# Altium PCB Fast_Servo.PCBDOC (part 7 of 11)
Units mm, origin at the board's own origin, x right, y up, seen from the top; angles counter-clockwise.
Board outline 162.48 x 100 mm, 6 copper layers (Top, GP1(GND), L3, L4, P3V3, Bot), stack 1.716 mm thick; 668 components, 491 nets, 2308 pads, 1133 vias.
Unrouted connection lines stored in the file: 2.
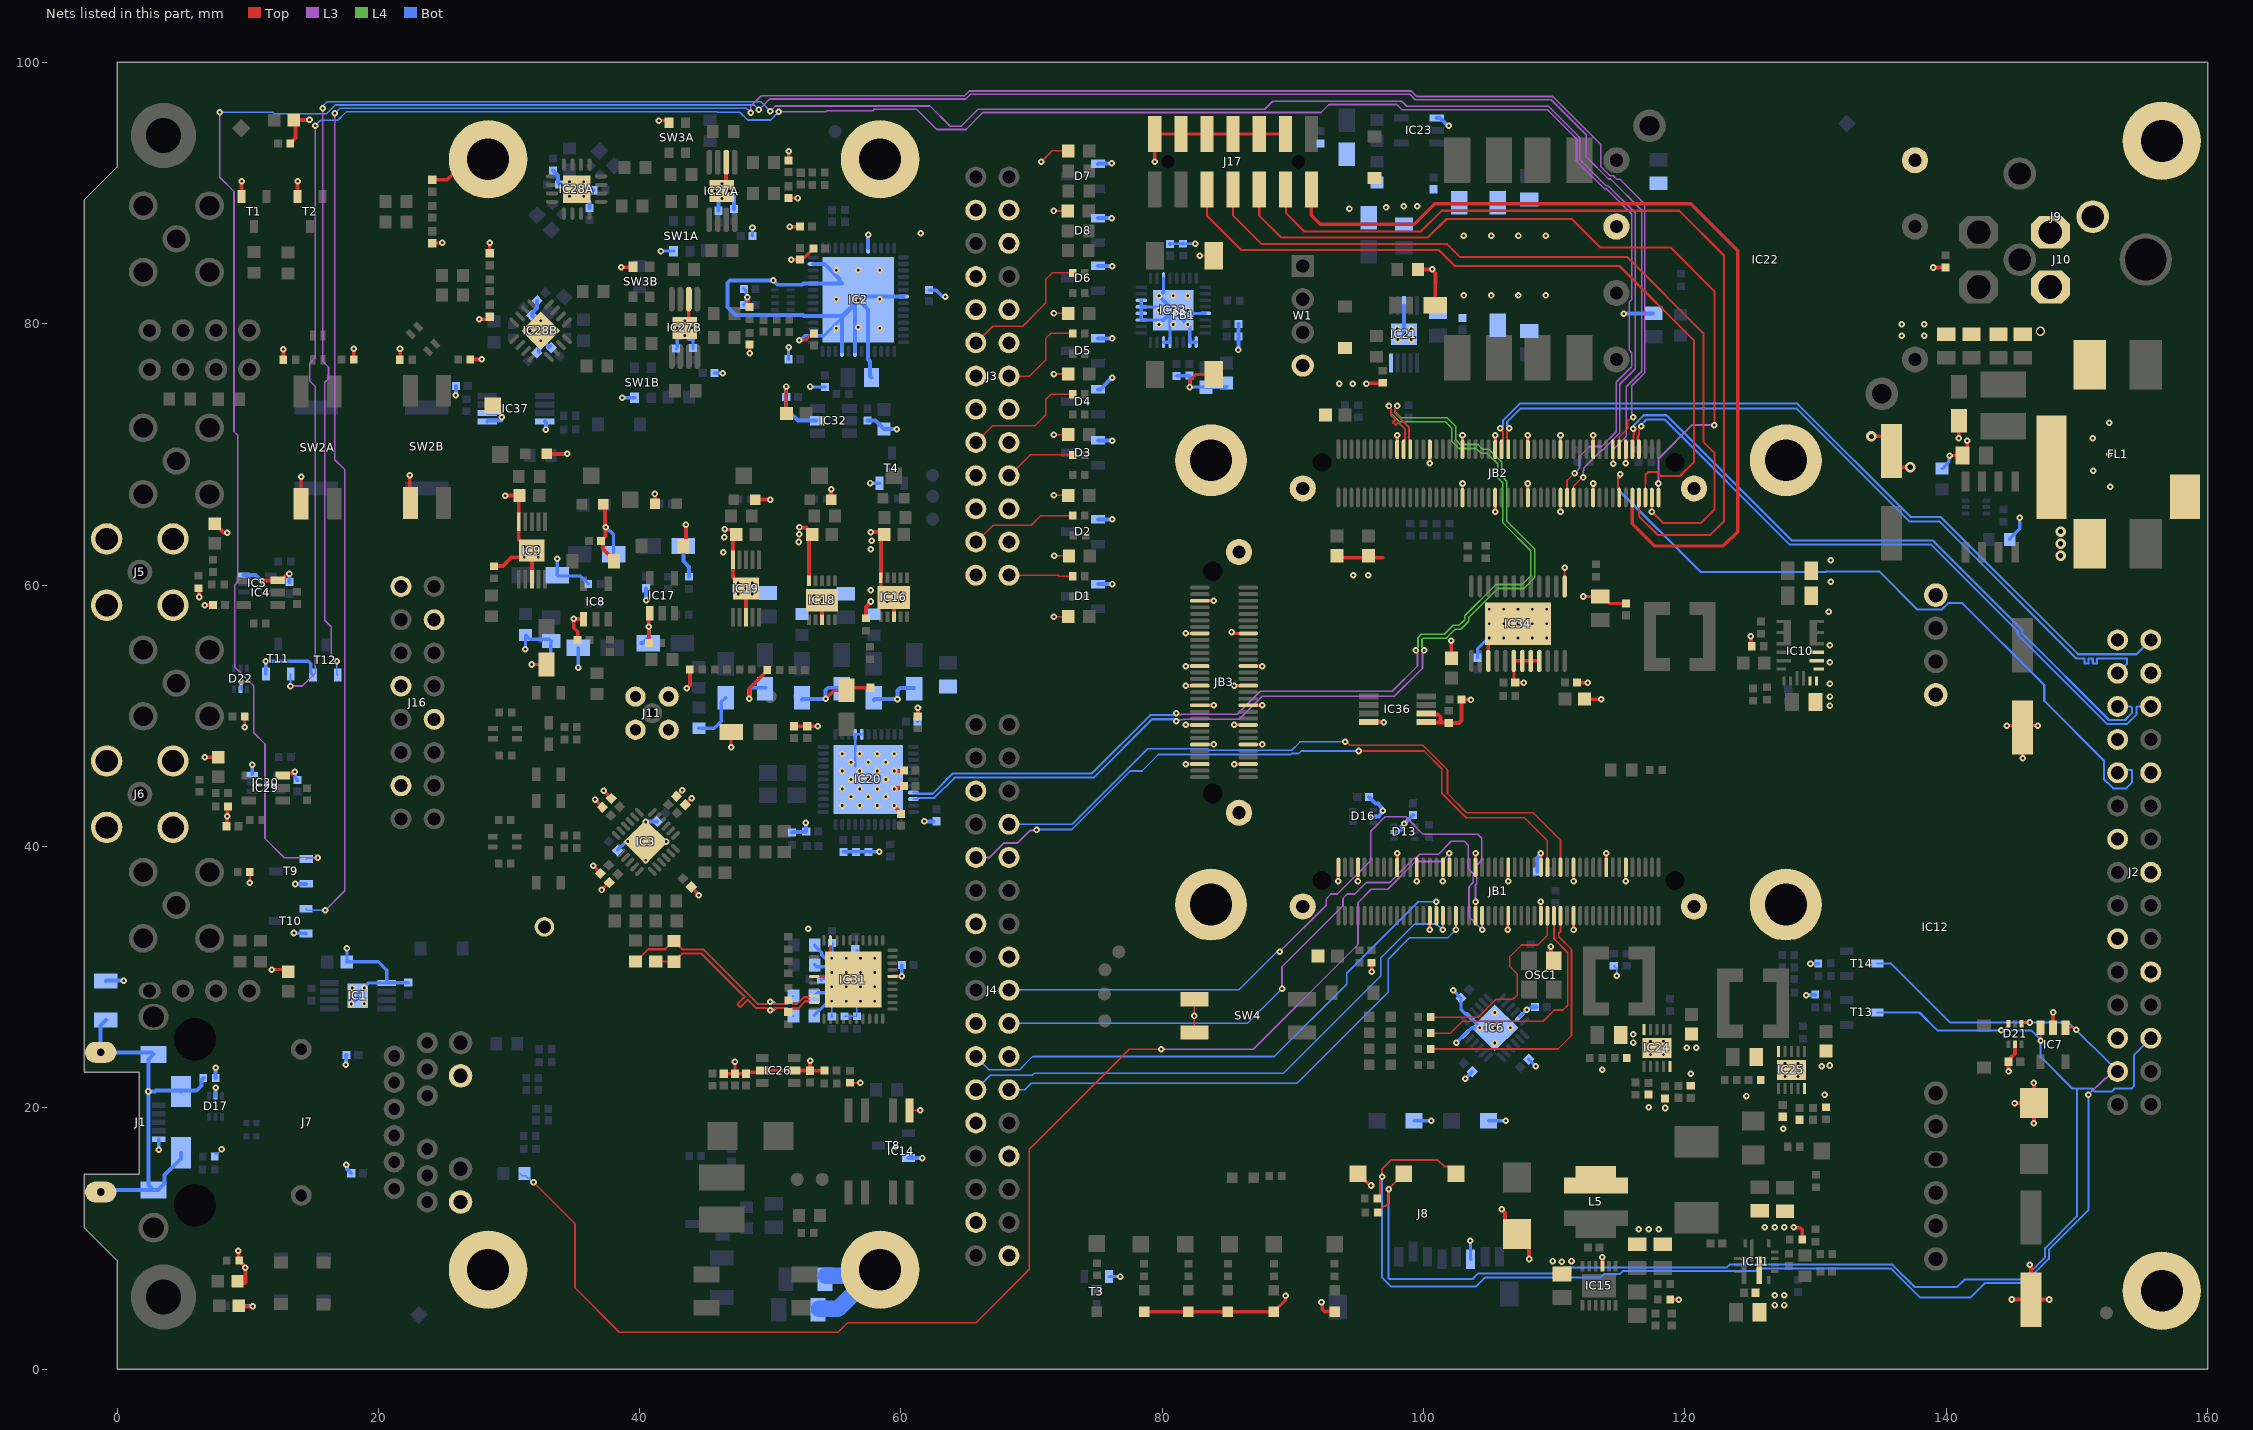
[diagram p9: the nets of this part, all layers, seen from the top]

## Via types
v1: diameter 0.5, hole 0.2, Top to Bot, tented both sides, 1045 vias
v2: diameter 0.8, hole 0.4, Top to Bot, tented both sides, 40 vias
v3: diameter 0.6, hole 0.3, Top to Bot, tented both sides, 27 vias
v4: diameter 1.27, hole 0.711, Top to Bot, tented both sides, 11 vias
v5: diameter 0.7, hole 0.5, Top to Bot, tented both sides, 10 vias

## Nets (pads, with @x,y where several pads share a name; then routed paths per layer and width w, separated by ;. In a path a pad name is that pad's centre, name@x,y a point inside that pad or via, vN(x,y) a via of type N, cw(c..) or ccw(c..) an arc to the next point about the centre after c; other vN are vias at no path point) (continued)
ETH_LED2: JB1.35 R85.1 | length 102.5
  Top w0.125: v1(31.877,14.3) 35.054,11.123 35.054,6.221 38.447,2.828 55.18,2.828 55.905,3.552 65.744,3.552 69.828,7.637 69.828,16.834 77.467,24.473 v1(79.925,24.473) ; JB1.35@101.975,38.404 v1(101.975,39.479)
  L3 w0.125: v1@79.925,24.486 86.958,24.486 94.975,32.503 94.975,35.701 95.999,36.725 97.246,36.725 99.371,38.85 101.346,38.85 v1(101.975,39.479)
  Bot w0.125: R85.1@30.848,14.965 31.012,14.801 31.292,14.801 31.793,14.3 v1(31.877,14.3)
FGND: C3.1 J1.6 J1.7 J1.8 J1.9 J1.10 J1.11 R6.1 | length 30.5
  Bot w0.3: J1.6@-1.25,13.545 -1.1,13.695 J1.9@2.8,13.695 ; C3.1@-0.85,26.711 -1.25,26.311 J1.7@-1.25,24.245 2.65,24.245 J1.8@2.8,24.095 2.398,23.693 v1(2.398,21.245) ; J1.11@4.9,16.545 4.9,16.095 3.65,14.845 3.65,14.196 3.15,13.695 J1.9@2.8,13.695 ; R6.1@6.605,22.275 6.465,22.135 6.465,21.682 6.1,21.317 4.972,21.317 J1.10@4.9,21.245 4.82,21.325 2.983,21.325 2.903,21.245 v1(2.398,21.245) ; v1(2.398,21.245) 2.398,17.177 2.4,17.175 2.4,14.095 J1.9@2.8,13.695
FP_LED_0: JB2.72 T11.1 | length 177.7
  Top w0.125: JB2.72@110.975,66.704 110.975,68.01 111.515,68.55 v1(111.55,68.55)
  L3 w0.125: v1(13.275,52.275) 14.177,52.275 15.175,53.273 15.175,75.2 14.75,75.625 14.75,76.975 15.159,77.384 v1(15.159,95.15) ; v1(50.65,96.225) 54.26,96.225 54.349,96.315 57.857,96.315 57.962,96.419 61.191,96.419 62.735,94.875 64.975,94.875 66.269,96.169 92.148,96.169 92.758,96.78 97.944,96.78 98.328,96.396 109.458,96.396 111.699,94.155 111.699,92.474 113.844,90.328 113.994,90.328 115.938,88.385 115.938,81.864 115.75,81.677 115.75,77.981 115.938,77.793 115.938,76.722 114.75,75.535 114.75,75.483 114.75,71.746 113.614,70.61 112.693,70.61 111.935,69.851 111.935,68.935 v1(111.55,68.55)
  Bot w0.125: v1(13.275,52.275) 13.275,53.182 T11.1@13.296,53.203 ; v1(15.159,95.15) 15.584,95.575 16.895,95.575 17.563,96.243 45.921,96.243 45.964,96.2 47.665,96.2 48.265,95.6 50.025,95.6 v1(50.65,96.225)
FP_LED_1: JB2.74 T12.1 | length 175.1
  Top w0.125: JB2.74@111.475,66.704 111.475,67.568 112.147,68.24 v1(112.225,68.24)
  L3 w0.125: v1(15.75,96.5) 15.75,77.125 16.188,76.687 16.188,75.813 15.9,75.525 15.9,57.31 16.4,56.81 16.4,54.6 v1(16.825,54.175) ; v1(50,96.275) 50.394,96.669 62.216,96.669 63.76,95.125 64.597,95.125 65.891,96.419 87.838,96.419 88.448,97.03 98.327,97.03 98.711,96.646 109.561,96.646 111.949,94.258 111.949,92.577 113.947,90.578 114.098,90.578 116.188,88.489 116.188,76.567 115,75.379 115,71.642 113.663,70.306 113.593,70.306 112.256,68.969 112.256,68.797 112.225,68.766 v1(112.225,68.24)
  Bot w0.125: v1(15.75,96.5) 15.8,96.55 15.8,96.725 16.068,96.993 49.282,96.993 v1(50,96.275) ; v1(16.825,54.175) 16.825,53.187 T12.1@16.9,53.112
FP_LED_2: JB2.85 T9.1 | length 199
  Top w0.125: JB2.85@114.475,70.404 114.475,69.329 114.525,69.279 v1(114.525,69.275)
  L3 w0.125: v1(7.858,96.18) 7.858,91.217 8.95,90.125 8.95,71.758 9.247,71.46 9.247,60.25 9.012,60.015 9.012,53.737 10.475,52.275 10.475,48.7 11.328,47.847 11.328,40.615 12.798,39.145 v1(15.376,39.145) 15.175,39.346 ; v1(49.125,96.4) 49.15,96.4 49.95,97.2 64.959,97.2 65.323,97.564 98.953,97.564 99.37,97.146 109.768,97.146 112.449,94.466 112.449,92.784 114.155,91.078 114.305,91.078 116.688,88.696 116.688,76.36 115.5,75.172 115.5,71.376 114.525,70.401 v1(114.525,69.275)
  Bot w0.125: v1(7.858,96.18) 11.931,96.18 12.048,96.062 16.019,96.062 16.699,96.743 48.782,96.743 v1(49.125,96.4) ; T9.1@14.485,39.042 14.589,39.145 v1(15.376,39.145)
FP_LED_3: JB2.87 T10.1 | length 189.3
  Top w0.125: JB2.87@114.975,70.404 114.977,70.406 114.977,71.341 115.602,71.967 115.602,72.569 115.691,72.657 115.757,72.657 115.939,72.838 v1(116.04,72.838)
  L3 w0.125: v1(15.95,35.125) 17.425,36.6 17.425,68.85 16.675,69.6 v1(16.675,96.1) ; v1(48.514,96.15) 48.514,96.664 49.3,97.45 64.856,97.45 65.22,97.814 99.056,97.814 99.474,97.396 109.872,97.396 113.549,93.719 113.549,92.038 114.258,91.328 114.522,91.328 114.8,91.05 115.039,91.05 116.938,89.151 116.938,76.256 115.938,75.256 115.938,73.099 115.968,73.068 115.968,72.91 v1(116.04,72.838)
  Bot w0.125: T10.1@14.45,35.234 14.559,35.125 v1(15.95,35.125) ; v1(16.675,96.1) 17.068,96.493 48.171,96.493 v1(48.514,96.15)
FPGA_CLK1.CLK_N: IC20.30 JB2.21 | length 80.2
  Top w0.16: 97.501,73.466 97.501,73.028 97.614,72.915 97.807,72.722 cw(c97.773,72.689) 97.807,72.655 97.663,72.51 ccw(c97.697,72.476) 97.663,72.442 97.821,72.284 ccw(c97.855,72.318) 97.889,72.284 98.033,72.428 cw(c98.067,72.394) 98.101,72.428 98.215,72.315 98.565,71.964 98.565,71.132 98.475,71.042 JB2.21@98.475,70.404
  L3 w0.125: v1(81.059,50.208) 81.16,50.208 81.286,50.082 81.425,50.082 81.462,50.119 85.743,50.119 87.499,51.875 97.606,51.875 99.535,53.805 v1@99.535,54.939
  L4 w0.125: v1(97.348,73.711) 97.348,73.611 97.509,73.45 97.509,73.147 98.139,72.517 101.651,72.517 102.019,72.149 102.147,72.021 102.147,70.995 102.683,70.46 104.038,70.46 104.267,70.231 104.394,70.104 104.851,70.104 105.664,69.291 105.664,68.225 105.842,68.047 106.055,67.834 106.055,64.786 106.197,64.643 108.204,62.636 108.204,60.706 107.544,60.045 105.537,60.045 103.142,57.651 103.142,57.361 102.71,56.929 102.272,56.929 101.579,56.236 99.822,56.236 99.57,55.984 99.57,55.438 99.57,55.261 99.409,55.1 v1(99.409,55)
  Bot w0.16: IC20.30@60.95,44.125 61.263,44.125 61.353,44.035 62.418,44.035 63.971,45.587 74.607,45.587 79.075,50.055 v1@80.975,50.055
FPGA_CLK1.CLK_P: IC20.31 JB2.23 | length 80.4
  Top w0.16: 97.821,73.466 97.821,73.16 98.885,72.097 98.885,71.132 98.975,71.042 JB2.23@98.975,70.404
  L3 w0.125: v1(81.059,49.581) 81.16,49.581 81.286,49.707 81.581,49.707 81.618,49.744 85.899,49.744 87.654,51.5 97.761,51.5 99.91,53.649 v1@99.91,54.939
  L4 w0.125: v1(97.975,73.711) 97.975,73.611 97.814,73.45 97.814,73.274 98.265,72.822 101.778,72.822 102.019,72.58 102.452,72.147 102.452,71.121 102.809,70.765 104.165,70.765 104.52,70.409 104.978,70.409 105.969,69.418 105.969,68.351 106.36,67.96 106.36,64.912 108.509,62.763 108.509,60.579 107.67,59.74 105.663,59.74 103.447,57.524 103.447,57.234 102.837,56.624 102.398,56.624 101.705,55.931 99.949,55.931 99.875,55.858 99.875,55.564 99.876,55.261 100.036,55.1 v1(100.036,55)
  Bot w0.16: IC20.31@60.95,43.625 61.263,43.625 61.353,43.715 62.551,43.715 64.103,45.267 74.74,45.267 79.207,49.735 v1@80.975,49.735
GND: B3.1 B4.1 B5.1 B6.1 C1.1 C2.1 C3.2 C4.1 C5.1 C6.1 C7.1 C8.1 C9.1 C10.1 C11.1 C12.1 C13.1 C14.1 C15.1 C16.1 C17.1 C18.1 C19.1 C23.2 C24.2 C25.1 C26.1 C27.1 C28.2 C29.2 C30.2 C31.2 C32.1 C33.1 C34.1 C35.1 C36.1 C37A.1 C37B.1 C38A.1 C38B.1 C39A.1 C39B.1 C41A.2 C41B.2 C45A.1 C45B.1 C46A.1 C46B.1 C47A.1 C47B.1 C48A.1 C48B.1 C49A.1 C49B.1 C51A.1 C51B.1 C52A.1 C52B.1 C57.1 C58.1 C59.1 C60.1 C65.1 C66.1 C67.1 C68.1 C69.1 C70.1 C71.1 C72.1 C73.2 C74.2 C75.1 C76.2 C77.2 C78.1 C79.1 C80.1 C81.2 C82.2 C83.2 C84.1 C85.1 C86.1 C87.1 C88.1 C89.1 C90.1 C91.1 C92.1 C93.1 C94.1 C97.1 C98.1 C99.1 C100.1 C101.1 C102.1 C104.1 C105.1 C106.1 C107.1 C108.1 C109.2 C110.2 C111.1 C112.1 C116.1 C117.1 C118.1 C119.1 C120.1 C121.1 C122.1 C124.2 C125.2 C127.1 C128.2 C129.1 C130.2 C131.2 C132.2 C133.1 C134.1 C135.2 C136.2 C137.1 C138.1 C139.1 C140.1 C141.1 C142.1 C143.2 C144.2 C145.1 C146.1 C147.2 C148.2 C149.1 C150.1 C151.1 C152.1 C153.1 C154.1 C155.2 C156.1 C157.1 C158.1 C159.1 C160.1 C161.1 C162.2 C163.1 C164.1 C165.2 C166.2 C167.1 C168.1 C169.2 C170.1 C171.2 C172.1 C173.1 C174.1 C175.1 C176.1 C177.1 C178.1 C179.1 C180.1 C181.1 C182.1 C183.1 C184.1 C186.1 C187.1 C188.2 C189.2 C190.1 C191.1 C192.1 C193.1 C194.1 C196.1 C197.1 C199.1 C203.1 C204.1 C205.1 D1.1 D2.1 D3.1 D4.1 D5.1 D6.1 D7.1 D8.1 D13.2 D16.2 D17.2 D21.2 D22.2 D23.2 D24.1 D25.1 D27.1 D28.2 D29.1 FL1.4 IC1.1 IC1.9 IC2.2 IC2.5 IC2.10 IC2.13 IC2.22 IC2.33 IC2.45 IC2.47 IC2.49 IC2.53 IC3.25 IC4.3 IC5.3 IC6.2 IC6.11 IC6.24 IC6.25 IC7.2 IC8.1 IC9.5 IC9.8 IC9.11 IC10.1 IC10.2 IC10.3 IC10.17 IC10.18 IC11.9 IC12.7 IC12.10 IC14.3 IC15.9 IC16.5 IC16.8 IC16.11 IC17.1 IC18.5 IC18.8 IC18.11 IC19.5 IC19.8 IC19.11 IC20.15 IC20.16 IC20.45 IC21.5 IC21.8 IC21.11 IC22.3 IC22.5 IC23.1 IC24.5 IC24.10 IC24.11 IC25.5 IC25.10 IC25.11 IC26.2 IC26.5 IC27A.6 IC27A.9 IC27B.6 IC27B.9 IC28A.17 IC28B.17 IC29.3 IC30.3 IC31.6 IC31.19 IC31.25 IC31.41 IC32.2 IC33.1 IC33.2 IC33.5 IC33.6 IC33.11 IC33.12 IC33.13 IC33.14 IC33.19 IC33.29 IC33.33 IC34.1 IC34.15 IC34.18 IC34.19 IC34.20 IC34.21 IC34.25 IC36.4 IC36.5 IC36.6 IC37.4 IC37.5 IC37.6 J1.5 J2.1 J2.4 J2.7 J2.10 J2.13 J2.16 J2.19 J2.22 J2.25 J3.2 J3.3 J3.5 J3.6 J3.8 J3.9 J3.11 J3.12 J3.14 J3.15 J3.17 J3.18 J3.20 J3.21 J3.23 J3.24 J4.1 J4.4 J4.7 J4.10 J4.13 J4.16 J4.19 J4.22 J4.25 J4.30 J5.2 J6.2 J7.15 J7.17 J8.6 J8.10 J11.2 J16.1 J16.4 J16.7 J16.10 J16.13 J17.3 J17.5 J17.7 J17.9 J17.11 J17.13 JB1.1 JB1.7 JB1.19 JB1.25 JB1.30 JB1.33 JB1.43 JB1.53 JB1.54 JB1.63 JB1.64 JB1.73 JB1.74 JB1.83 JB1.89 JB1.F1 JB1.F2 JB2.19 JB2.29 JB2.39 JB2.40 JB2.49 JB2.50 JB2.59 JB2.60 JB2.69 JB2.70 JB2.79 JB2.80 JB2.89 JB2.F1 JB2.F2 JB3.5 JB3.6 JB3.11 JB3.12 JB3.17 JB3.18 JB3.23 JB3.24 JB3.29 JB3.30 JB3.35 JB3.36 JB3.45 JB3.46 JB3.55 JB3.F1 JB3.F2 L5.2 LD6.1 LD7.1 LD8.1 LD9.2 LD10.1 LD11.2 LD12.1 LD13.2 LD14.1 LD15.1 OSC1.2 pad.0 pad.1 pad.3 PB1.3 PB1.4 R5.1 R6.2 R8.1 R9.1 R13.1 R14.1 R15.1 R16.1 R17.2 R18.2 R20.1 R49A.1 R49B.1 R57A.1 R57B.1 R63.1 R73.1 R83.2 R86.1 R92.2 R116.1 R117.1 R119.1 R127.1 R131.1 R134.1 R143.1 R153.1 R154.1 R156.1 R164.1 R167.1 R169.1 R175.1 R178.1 R181.1 R182.1 R183.2 R186.1 R187.1 R189.1 R190.1 R191.2 R192.1 R204.1 R206.1 R211.1 R212.1 R215.1 R217.1 R219.1 R223.1 R225.1 R230.1 SW1A.2 SW1B.2 SW2A.3 SW2B.3 SW3A.2 SW3B.2 SW4.1 SW4.2 T1.2 T2.2 T3.2 T4.2 T8.2 T9.2 T10.2 T11.2 T12.2 TP12.1 TP13.1 TP14.1 W1.4 | length 551.5
  Top w0.125: R20.1@56.1,21.905 56.116,21.921 v1(56.9,21.921) ; IC14.3@60.651,19.803 v1(61.477,19.803) ; v1(70.743,92.405) 71.576,93.238 C18.1@72.809,93.238 ; v1(71.684,88.635) C19.1@72.777,88.635 ; v1(71.709,57.584) C12.1@72.802,57.584 ; v1(71.709,66.871) C14.1@72.802,66.871 ; v1(71.709,71.514) C15.1@72.802,71.514 ; v1(71.709,76.157) C16.1@72.802,76.157 ; v1(71.709,80.8) C17.1@72.802,80.8 ; v1(71.742,62.259) C13.1@72.834,62.259 ; SW4.2@82.457,25.757 v1@82.457,26.935 ; v1(82.457,27.026) SW4.1@82.457,28.297 ; v1(82.875,85.218) PB1.3@83.935,85.218 ; v1(85.3,56.411) v1@85.406,56.305 ; v1(110.795,61.326) 110.798,61.324 110.798,59.907 IC34.1@110.8,59.905
  Top w0.16: v1(9.78,49.129) R189.1@9.78,49.96 ; v1(10.168,37.225) R190.1@10.168,38.056
  Top w0.25: v1(11.851,30.576) 13.098,30.576 C74.2@13.1,30.575 ; SW2A.3@14.086,66.231 v1(14.086,68.3) ; SW2B.3@22.411,66.34 v1(22.411,68.409) ; TP12.1@28.752,73.727 29.407,73.071 29.407,72.899 v1(29.455,72.851) ; v1(31.748,53.925) C109.2@32.875,53.925 ; v1(34.947,57.416) 34.947,56.745 35.253,56.439 C99.1@35.253,55.796 ; C68.1@43.945,36.918 43.945,36.865 v1(44.532,36.277) ; C6.1@46.437,22.605 C9.1@47.176,22.605 ; v1(47,47.6) 47,48.743 C162.2@47.011,48.754 ; v1(47.294,23.51) 47.294,22.723 C9.1@47.176,22.605 ; v1@51.497,87.435 C29.2@52.282,87.435 ; v1(51.59,84.91) 52.226,84.91 52.41,85.094 52.644,85.094 C31.2@53.3,85.75 ; C156.1@51.8,49.2 C157.1@52.825,49.2 v1(53.627,49.2) ; IC26.5@51.843,22.84 IC26.5@51.832,22.851 IC26.2@49.382,22.851 49.26,22.728 48.274,22.728 C10.1@48.151,22.605 C9.1@47.294,22.605 C9.1@47.176,22.605 ; v1(52.224,78.752) 52.685,78.752 53.183,79.25 C26.1@53.334,79.25 ; C11.1@52.964,22.797 52.979,22.782 C11.1@53.017,22.743 ; C11.1@53.016,22.84 C11.1@53.026,22.83 53.034,22.837 54.205,22.837 54.208,22.84 54.204,22.845 C4.1@54.151,22.845 ; IC31.25@53.351,30.055 IC31.41@55.801,30.055 ; v1(54.232,51.292) 54.88,51.94 C155.2@56.244,51.94 ; IC31.19@54.601,32.805 54.601,31.555 v1(54.701,31.455) v1(55.801,30.355) IC31.41@56.351,29.805 ; C155.2@55.825,51.95 56.024,52.149 C158.1@57.659,52.149 ; v1@59.579,42.962 59.588,42.962 C154.1@60,42.55 ; v1@61.225,50.575 v1(61.273,50.623) 61.279,50.617 61.279,49.966 C161.1@61.285,49.96 ; LD9.2@78.614,4.396 88.529,4.396 LD8.1@88.545,4.38 89.431,5.266 v1(89.431,5.624) ; v1(79.422,92.405) J17.13@79.422,94.53 J17.11@81.422,94.53 J17.3@89.422,94.53 ; v1(81.8,46.305) JB3.5@82.875,46.305 ; v1(81.8,49.305) JB3.17@82.875,49.305 ; v1(81.8,52.305) JB3.29@82.875,52.305 ; v1(81.8,53.805) JB3.35@82.875,53.805 ; v1(81.8,56.305) JB3.45@82.875,56.305 ; v1(82.096,75.159) 82.096,75.663 82.552,76.118 PB1.4@83.935,76.118 ; v1@82.457,26.935 v1(82.457,27.026) ; JB3.11@82.875,47.805 v1(83.95,47.805) ; JB3.23@82.875,50.805 v1(83.95,50.805) ; JB3.55@82.875,58.805 v1(83.95,58.805) ; v1@85.406,56.305 JB3.46@86.575,56.305 ; v1(85.5,46.305) JB3.6@86.575,46.305 ; v1(85.5,49.305) JB3.18@86.575,49.305 ; v1(85.5,52.305) JB3.30@86.575,52.305 ; JB3.12@86.575,47.805 v1(87.65,47.805) ; JB3.24@86.575,50.805 v1(87.65,50.805) ; JB3.36@86.575,53.805 v1(87.65,53.805) ; v1(92.184,5.102) 92.232,5.054 92.232,4.564 92.416,4.38 LD10.1@93.191,4.38 ; v1(93.475,37.329) JB1.1@93.475,38.404 ; C131.2@93.536,62.099 95.649,62.099 95.65,62.1 96.868,62.1 ; v1(94.975,37.329) JB1.7@94.975,38.404 ; JB1.19@97.975,38.404 v1(97.975,39.479) ; JB2.19@97.975,70.404 v1(97.975,71.479) ; v1(99.475,37.329) JB1.25@99.475,38.404 ; v1(100.475,33.629) JB1.30@100.475,34.704 ; v1(100.475,69.329) JB2.29@100.475,70.404 ; v1(101.475,37.329) JB1.33@101.475,38.404 ; JB2.40@102.975,66.704 v1(102.975,67.779) ; JB2.39@102.975,70.404 v1(102.975,71.479) ; JB1.43@103.975,38.404 v1(103.975,39.479) ; v1(105.475,65.629) JB2.50@105.475,66.704 ; JB2.49@105.475,70.404 v1(105.475,71.479) ; v1(106.437,33.629) 106.465,33.657 106.465,34.694 JB1.54@106.475,34.704 ; v1(106.475,37.329) JB1.53@106.475,38.404 ; JB2.60@107.975,66.704 v1(107.975,67.779) ; JB2.59@107.975,70.404 v1(107.975,71.479) ; JB1.64@108.975,34.704 v1(108.975,35.779) ; JB1.63@108.975,38.404 v1(108.975,39.479) ; v1(110.475,65.629) JB2.70@110.475,66.704 ; JB2.69@110.475,70.404 v1(110.475,71.479) ; v1(111.475,33.629) JB1.74@111.475,34.704 ; v1(111.475,37.329) JB1.73@111.475,38.404 ; JB2.80@112.975,66.704 v1(112.975,67.779) ; JB2.79@112.975,70.404 v1(112.975,71.479) ; JB1.83@113.975,38.404 v1(113.975,39.479) ; v1(115.475,37.329) JB1.89@115.475,38.404 ; v1(115.475,69.329) JB2.89@115.475,70.404 ; v1(140.25,69.916) C176.1@141.235,69.916 141.596,70.277 v1(141.596,71.042) ; v1(140.947,71.249) 140.947,72.569 C171.2@140.971,72.592 ; v1(144.615,49.25) v1(147,49.25) ; v1(145.85,46.75) C124.2@145.85,49.104
  Top w0.254: C47A.1@24.14,86.165 24.157,86.182 24.882,86.182 v1(24.9,86.2) ; C39A.1@24.14,91.035 25.28,91.035 26.845,92.6 pad.3@28.4,92.6 pad.3@28.992,92.008 ; v1(27.722,80.35) 28.35,80.35 C47B.1@28.54,80.54 ; v1(28.525,86.2) 28.532,86.193 28.532,85.417 C39B.1@28.54,85.41 ; v1@36.434,38.514 C59.1@37,37.948 ; v1@36.585,43.574 C57.1@37.15,43.008 ; v1@37.106,36.671 C65.1@37.672,37.236 ; v1@37.256,44.245 C67.1@37.822,43.68 ; v1(38.589,84.327) 39.466,84.327 SW3B.2@39.504,84.364 ; v1(41.477,95.555) 42.059,95.555 SW3A.2@42.239,95.375 ; C60.1@42.754,43.795 C60.1@42.762,43.787 ; C60.1@42.893,43.843 C60.1@42.818,43.843 43.274,44.299 v1(43.274,44.315) ; C58.1@43.424,43.124 C58.1@43.426,43.123 ; IC27B.9@43.438,79.687 43.763,80.012 IC27B.6@43.763,81.887 ; C58.1@43.481,43.193 C58.1@43.493,43.193 v1(44,43.7) ; v1(48.253,82.043) 48.3,81.995 48.3,81.405 C45B.1@48.422,81.283 ; C41B.2@48.422,78.405 48.424,78.403 48.424,77.757 v1(48.426,77.755) ; C32.1@51.081,73.146 51.226,73.29 v1(51.226,75.2) ; C41A.2@51.4,89.625 v1(52.088,89.625) ; C45A.1@51.4,92.503 v1(51.4,93.206) ; IC31.6@59.351,30.055 v1(60.051,30.055) ; TP13.1@94.975,14.956 95.834,14.097 95.928,14.097 v1(95.975,14.05) ; v1(96.02,30.416) R156.1@96.02,31.109 ; C93.1@102.125,54.405 v1(102.125,55.729) ; IC34.15@104.95,54.205 IC34.25@104.95,55.955 ; v1(107.674,52.539) C97.1@107.013,52.539 106.918,52.634 106.918,54.186 IC34.18@106.9,54.205 IC34.19@107.55,54.205 IC34.20@108.2,54.205 IC34.21@108.85,54.205 ; C92.1@111.725,52.539 v1(112.571,52.539) ; v1(112.225,59.129) C120.1@113.525,59.129 113.836,58.818 113.975,58.818 114.195,58.598 C121.1@115.475,58.598 ; C91.1@112.313,51.275 v1(113.581,51.275) ; v1(128.327,10.87) 128.374,10.823 128.834,10.823 128.977,10.68 R143.1@128.977,9.92 ; v2(134.275,71.383) 135.127,71.383 135.8,70.71 C125.2@135.8,70.275 135.8,69.698 136.473,69.025 v2(137.25,69.025)
  Top w0.3: R83.2@6.24,59.774 6.271,59.743 6.271,59.121 v1(6.302,59.09) ; v1(6.73,46.825) 7.721,46.825 C72.1@7.736,46.84 ; v1(6.73,58.46) 6.738,58.467 7.342,58.467 C70.1@7.35,58.475 ; C69.1@7.475,64.71 8.147,64.038 8.392,64.038 v1(8.43,64) ; C71.1@8.39,41.544 8.41,41.564 8.41,42.288 v1(8.43,42.309) 8.463,42.342 8.463,43.017 R92.2@8.496,43.05 ; v1(9.275,9.05) 9.31,9.015 9.31,8.335 R86.1@9.345,8.3 9.345,8.28 9.825,7.8 v1(9.825,7.75) 9.825,6.625 9.775,6.575 9.525,6.575 C76.2@9.375,6.725 ; C83.2@9.475,4.85 9.525,4.8 v1(10.4,4.8) ; T1.2@9.538,89.731 v1(9.539,90.902) ; v1(11.084,60.314) 11.114,60.345 12.268,60.345 IC4.3@12.298,60.375 12.548,60.375 12.991,60.818 13.162,60.818 v1(13.2,60.856) ; IC29.3@12.695,45.42 12.845,45.57 13.397,45.57 13.542,45.715 v1(13.596,45.715) ; v1(12.715,78.067) 12.73,78.052 R49A.1@12.73,77.245 ; R116.1@13.26,93.8 13.26,93.82 13.67,94.23 13.67,95.555 13.721,95.606 v1(14.732,95.606) ; T2.2@13.825,89.731 v1(13.826,90.903) ; R57A.1@18.12,77.275 v1@18.12,78.081 ; R49B.1@21.675,77.28 v1@21.675,78.086 ; R57B.1@27.084,77.28 v1@27.891,77.28 ; R219.1@28.85,61.459 29.531,61.459 30.204,62.131 v1(31.17,62.131) ; v1(29.728,66.849) C197.1@30.803,66.849 ; C197.1@30.745,66.791 IC9.5@30.745,64.849 30.745,63.499 31.595,62.649 IC9.11@31.745,62.649 IC9.8@31.745,60.449 ; LD6.1@32.902,70.045 v1(34.455,70.045) ; v1(34.947,57.416) 35.682,57.416 IC8.1@35.703,57.395 ; LD11.2@37.203,66.201 37.363,66.041 37.363,64.48 v1(37.401,64.442) 37.401,63.745 37.195,63.538 37.195,63.529 37.039,63.374 37.03,63.374 37.195,63.209 37.195,62.764 38.053,61.905 D24.1@38.053,61.825 ; C137.1@40.724,55.561 40.724,55.911 40.699,55.886 v1(40.699,56.823) 40.699,57.76 IC17.1@40.774,57.835 ; v1(41.163,66.978) 41.168,66.972 41.168,66.236 LD13.2@41.174,66.231 ; D27.1@43.5,63.473 43.543,63.516 v1(43.543,64.63) ; v1(43.604,52.105) 43.85,52.351 R212.1@43.85,53.553 ; IC27A.9@46.299,90.162 46.624,90.487 IC27A.6@46.624,92.362 ; v1(46.512,64.262) 46.536,64.238 47.057,64.238 47.382,63.913 C145.1@47.382,63.888 47.131,63.638 IC19.5@47.131,61.942 47.131,60.591 v1(47.557,60.167) 47.982,59.742 IC19.11@48.132,59.742 ; IC19.8@48.132,57.542 IC19.11@48.132,59.742 ; IC19.11@48.182,59.792 IC19.11@48.132,59.742 ; v1(48.394,51.292) 48.394,52.105 49.766,53.477 R215.1@49.766,53.497 ; LD7.1@48.863,66.539 49.988,66.539 v1(49.99,66.541) ; IC26.5@51.843,22.84 C11.1@53.016,22.84 ; v1(52.231,64.442) 52.27,64.404 52.717,64.404 53.207,63.913 C141.1@53.207,63.888 52.957,63.638 IC18.5@52.957,60.591 ; C11.1@53.026,22.83 53.026,23.579 v1(53.05,23.602) ; IC18.8@53.957,57.542 IC18.11@53.957,58.843 ; LD12.1@54.659,66.539 v1@54.659,67.325 ; R217.1@57.324,57.452 57.324,58.324 57.693,58.693 v1(57.693,58.747) ; v1(57.693,64.06) 58.517,64.06 C133.1@58.708,63.869 58.458,63.619 IC16.5@58.458,60.572 ; IC16.5@58.455,60.567 58.455,59.792 59.18,59.067 IC16.11@59.455,59.067 ; IC16.8@59.458,57.522 IC16.11@59.458,59.067 ; v1(59.485,44.4) 59.539,44.4 59.604,44.465 60.065,44.465 C160.1@60.225,44.625 ; v1(59.485,45.775) 59.497,45.788 60.213,45.788 C152.1@60.225,45.8 ; v1(95.626,75.424) 95.654,75.452 96.84,75.452 R223.1@96.868,75.48 ; IC36.4@95.816,49.515 95.821,49.511 96.954,49.511 v1(96.959,49.506) ; R175.1@99.575,84.15 99.588,84.163 v1(100.662,84.163) 100.662,84.109 100.911,83.86 100.911,83.063 100.892,83.043 C166.2@100.892,81.411 ; IC36.5@100.216,49.515 100.248,49.483 101.28,49.483 ; IC36.6@100.216,50.165 100.291,50.09 101.099,50.09 101.28,49.91 101.28,49.483 ; v1(103.625,51.212) 103.597,51.24 C204.1@102.891,51.24 102.9,51.232 102.9,49.655 102.695,49.45 R230.1@101.923,49.45 101.891,49.483 101.28,49.483 ; v1(105.975,12.237) 106.228,11.983 106.228,11.275 D25.1@107.153,10.35 108.07,9.433 v1(108.07,8.425) ; v1(109.735,32.339) 109.735,31.491 OSC1.2@109.97,31.256 ; IC15.9@113.675,7.87 v1(113.675,8.55) ; R183.2@118.867,5.32 v1(119.539,5.32) ; v1(125.047,56.077) 125.047,55.38 R131.1@125.105,55.322 ; v1(139,84.309) 139.001,84.31 R178.1@139.95,84.31 ; v1(144.765,22.778) C98.1@144.765,23.525 144.925,23.685 144.925,23.794 145.265,24.134 D21.2@145.265,24.861 ; v1(145,5.327) 146.473,5.327 C81.2@146.5,5.3 ; v1(145.225,20.35) 145.322,20.35 145.347,20.375 D23.2@146.7,20.375 ; v1(146.375,8) 146.375,7.946 146.5,7.821 C81.2@146.5,5.3 ; v1(146.7,18.821) D23.2@146.7,20.375 ; v1(146.7,21.898) D23.2@146.7,20.375 ; v1(147.875,5.327) 146.527,5.327 C81.2@146.5,5.3 ; IC7.2@148.175,26.125 v1(148.175,27.293)
  Bot w0.125: R5.1@7.503,16.5 7.7,16.5 8,16.8 v1(8,16.825) ; R18.2@54.701,26.987 v1(54.701,28.155) ; R15.1@55.676,27 R16.1@56.626,27 56.626,27.812 v1@56.901,28.087 ; C80.1@103.715,22.765 C80.1@103.718,22.765 ; R186.1@114.55,30.862 114.553,30.862 114.781,30.634 v1(114.781,30.101)
  Bot w0.16: J16.10@24.27,49.73 J16.10@24.295,49.73
  Bot w0.2: IC20.45@56.5,46.125 IC20.15@56.5,48.475 ; IC20.15@56.5,48.575 IC20.16@57,48.575 ; C84.1@80.612,86.124 R119.1@81.558,86.124 ; R119.1@81.573,86.139 v1(82.508,86.139)
  Bot w0.25: v1(3.2,16.775) J1.5@3.2,17.595 ; v1(17.6,32.2) 17.6,31.178 C2.1@17.593,31.171 20.013,31.171 20.643,30.541 IC1.1@20.643,29.556 ; IC1.9@17.773,28.263 18.037,28 18.443,28.406 IC1.9@18.443,28.581 18.443,28.741 19.258,29.556 IC1.1@20.643,29.556 ; C1.1@22.293,29.581 22.281,29.569 20.656,29.569 IC1.1@20.643,29.556 ; v1(31.258,55.079) R134.1@31.258,56.188 31.583,55.863 33.087,55.863 C108.1@33.231,55.718 33.188,55.675 33.188,54.288 32.825,53.925 v1(31.748,53.925) v1@31.745,53.928 ; C38B.1@31.801,80.584 32.136,80.248 v1(32.419,80.248) ; v1(33.688,62.025) C110.2@33.688,60.762 33.76,60.69 35.464,60.69 35.873,60.28 35.893,60.28 36.058,60.115 R127.1@36.058,60.095 ; C38A.1@33.952,90.662 34.427,90.662 34.579,90.814 v1(34.627,90.862) ; v1@34.947,57.349 v1(34.947,57.416) ; v1(37.401,64.442) 38.005,63.839 C101.1@38.005,62.373 ; R73.1@38.301,39.702 38.974,40.375 v1(39.075,40.375) ; C66.1@43.966,36.868 44.532,36.301 v1(44.532,36.277) ; C48A.1@48.637,86.717 v1(48.637,87.352) ; C30.2@51.384,77.286 51.392,77.294 51.392,78.195 v1(51.4,78.203) ; v1(52.224,78.752) 52.292,78.752 52.628,79.088 IC2.2@53.284,79.088 54.109,79.088 IC2.53@56.484,81.463 ; v1(53.05,75.2) 53.094,75.156 C28.2@54.2,75.156 ; R9.1@53.368,27.067 54.014,27.713 54.456,28.155 v1(54.701,28.155) ; R8.1@53.368,28.553 53.628,28.813 54.26,28.813 v1(54.701,29.255) ; R13.1@53.394,30.94 53.537,30.797 54.26,30.797 v1(54.701,30.355) 54.701,30.055 54.56,29.913 54.009,29.913 C8.1@53.901,29.805 ; R14.1@53.394,32.453 53.394,32.403 53.941,31.856 53.941,31.719 54.205,31.455 v1(54.701,31.455) 54.714,31.467 54.714,32.597 R17.2@54.726,32.61 ; R18.2@54.701,26.987 R18.2@54.705,26.983 ; C159.1@55.59,39.585 C149.1@56.545,39.585 ; C149.1@56.5,39.6 v1(58.35,39.6) ; C7.1@56.63,32.03 56.861,31.799 56.861,31.495 v1(56.901,31.455) ; v1@56.901,28.087 v1(56.901,28.155) ; v1(60.051,30.055) 60.061,30.065 60.061,30.92 C5.1@60.071,30.93 ; C153.1@61.275,49.575 61.275,50.425 v1@61.475,50.625 ; C36.1@62.141,82.593 62.165,82.569 62.7,82.569 63.205,82.064 v1(63.382,82.064) ; T3.2@75.929,7.086 T3.2@75.932,7.083 v1(76.788,7.083) ; IC33.14@78.396,81.793 IC33.13@78.396,81.298 IC33.13@78.396,81.293 ; IC33.33@79.746,81.293 IC33.13@78.396,81.293 ; IC33.6@80.096,78.593 80.596,78.593 IC33.5@80.596,78.598 IC33.33@80.596,80.793 ; IC33.33@80.096,80.293 78.396,80.293 IC33.11@78.396,80.298 IC33.12@78.396,80.798 IC33.13@78.396,81.293 ; IC33.33@80.096,82.443 IC33.19@80.096,83.493 ; IC33.33@81.096,80.793 IC33.29@83.296,80.793 ; C85.1@81.098,76.019 81.106,76.027 82.089,76.027 C87.1@82.096,76.034 v1(82.096,75.159) 83.333,75.159 C86.1@83.348,75.144 84.867,75.144 C89.1@84.923,75.2 ; IC33.33@82.096,79.793 IC33.2@82.096,78.598 82.096,78.593 IC33.1@82.596,78.593 ; J8.10@99.27,19 v1(100.59,19) ; v1(102.255,28.995) 102.255,28.992 102.857,28.39 102.857,27.945 ; v1(102.501,24.976) IC6.24@103.155,25.63 ; 102.856,27.945 102.856,27.53 103.191,27.195 103.319,27.195 IC6.2@103.541,26.974 IC6.25@104.389,26.125 ; v1(103.175,22.225) C80.1@103.715,22.765 ; IC6.24@103.187,25.63 103.201,25.63 103.696,26.125 IC6.25@104.389,26.125 ; v1(103.575,9.825) 103.588,9.812 103.588,8.413 J8.6@103.6,8.4 ; C94.1@104.125,54.438 104.125,55.122 104.957,55.955 v1(105.025,55.955) ; J8.10@104.97,19 v1(106.29,19) ; v1(105.45,26.125) IC6.25@104.389,26.125 ; IC6.11@107.361,26.974 v1(107.9,27.513) 107.968,27.513 108.096,27.641 108.55,27.641 C129.1@108.625,27.716 ; C79.1@108.04,23.719 v1(108.579,23.178) ; R153.1@139.672,68.92 139.722,68.92 140.047,69.245 140.047,69.295 140.202,69.451 140.202,69.869 v1(140.25,69.916) ; R154.1@144.857,63.5 144.857,63.55 145.617,64.31 v1(145.617,65.145)
  Bot w0.254: D22.2@9.46,52.046 9.483,52.069 9.483,52.576 v1(9.519,52.612) ; IC30.3@10.345,45.515 v1(10.345,46.25) ; v1(11.395,54.175) 14.648,54.175 14.83,53.993 14.83,53.282 T12.2@15,53.112 ; T11.2@11.396,53.203 v1(11.395,54.175) ; v1(35.303,53.694) C100.1@35.303,55.206 ; v1(38.654,74.347) SW1B.2@39.627,74.347 ; v1(41.632,85.567) SW1A.2@42.592,85.567 SW1A.2@42.605,85.567 ; C46B.1@42.789,78.101 42.888,78.2 42.888,78.943 v1(42.888,79.687) ; v1(43.988,79.687) 43.988,79.621 44.084,79.525 44.084,78.831 C48B.1@44.084,78.136 ; R191.2@44.532,49.042 45.725,49.042 46.25,49.566 46.25,51.058 C148.2@46.584,51.392 ; C49B.1@45.73,76.247 45.744,76.233 46.346,76.233 v1(46.359,76.22) ; C23.2@47.975,81.438 48.158,81.621 48.158,81.881 48.298,82.022 v1@48.298,82.088 ; C24.2@47.975,82.679 48.142,82.512 48.142,82.28 48.206,82.216 48.206,82.09 v1(48.253,82.043) ; C33.1@51.218,74.402 51.222,74.406 51.222,75.196 v1(51.226,75.2)
  Bot w0.3: C3.2@-0.85,29.711 -0.836,29.725 v1(0.525,29.725) ; v1(7.545,21.541) 7.551,21.535 D17.2@7.551,20.907 ; R6.2@7.545,22.275 7.548,22.278 7.548,23.054 v1(7.551,23.057) ; R117.1@9.294,4.85 9.319,4.825 10.375,4.825 v1(10.4,4.8) ; IC5.3@9.695,60.784 10.595,60.784 11.064,60.314 v1(11.084,60.314) ; C190.1@13.2,60.244 v1(13.2,60.856) ; v1(13.542,33.375) 13.562,33.355 14.43,33.355 T10.2@14.45,33.334 ; v1(13.596,45.715) 13.596,45.661 13.64,45.617 13.64,45.26 C191.1@13.8,45.1 ; v1(13.64,37.125) 13.648,37.133 14.477,37.133 T9.2@14.485,37.142 ; v1(17.5,23.291) 17.53,23.321 17.53,24.006 C77.2@17.559,24.036 ; v1(17.559,15.64) 17.598,15.602 17.598,15.316 C75.1@17.924,14.99 ; v1(25.937,74.524) 25.941,74.527 25.941,75.248 C205.1@25.945,75.252 ; IC37.5@28.335,72.524 28.41,72.599 29.371,72.599 29.417,72.645 29.417,72.813 v1(29.455,72.851) ; IC37.6@28.335,73.174 29.296,73.174 29.465,73.005 29.465,72.944 29.519,72.89 v1@29.548,72.89 ; C38B.1@31.801,80.584 31.801,80.874 32.151,81.225 C51B.1@32.151,81.756 ; C37B.1@32.289,77.89 32.289,78.508 32.419,78.638 v1(32.419,78.692) 32.458,78.654 32.621,78.654 33.066,78.209 C52B.1@33.179,78.322 ; IC37.4@32.735,72.524 32.751,72.524 32.826,72.449 v1(32.826,71.907) ; C51A.1@33.371,91.739 33.746,91.364 33.746,90.868 C38A.1@33.952,90.662 ; v1(35.727,89.762) v1(35.727,89.762) 36.152,89.336 C37A.1@36.152,88.855 ; v1(35.727,90.862) 36.364,90.225 C52A.1@36.471,90.225 ; C138.1@40.149,55.561 40.224,55.561 40.444,55.781 40.699,56.036 v1(40.699,56.823) ; v1(40.475,41.875) 40.529,41.875 40.571,41.917 41.302,41.917 R63.1@41.316,41.903 ; v1(40.499,58.843) C140.1@40.499,59.76 ; 42.888,78.943 43.222,78.943 ; v1(43.438,79.106) 43.492,79.106 43.767,78.831 44.084,78.831 ; v1(43.543,64.63) 43.543,63.213 43.337,63.007 C139.1@43.349,62.995 43.349,61.825 43.774,61.4 R167.1@43.774,60.655 ; v1(45.749,90.162) 45.749,90.108 46.049,89.808 46.049,88.659 C46A.1@46.04,88.65 ; v1(46.849,90.162) 46.849,90.108 47.214,89.743 C49A.1@47.214,88.791 ; v1(48.394,51.292) 48.399,51.297 48.399,51.968 48.575,52.143 C147.2@49.65,52.143 ; v1(50.211,83.317) 46.9,83.317 46.724,83.141 46.724,81.288 47.333,80.679 52.49,80.679 52.581,80.589 IC2.5@53.284,80.589 55.484,80.589 IC2.53@56.734,81.838 ; v1@50.218,83.31 50.537,82.99 52.435,82.99 52.533,83.088 IC2.10@53.284,83.088 55.484,83.088 55.283,83.289 55.283,83.439 54.134,84.589 IC2.13@53.284,84.589 ; C33.1@51.218,74.402 51.218,73.496 52.121,72.593 IC32.2@53.487,72.593 ; R225.1@51.669,41.065 51.703,41.1 52.712,41.1 C203.1@52.747,41.134 52.732,41.15 52.732,41.802 v1(52.716,41.817) ; C144.2@52.422,51.242 52.472,51.292 v1(54.232,51.292) 54.237,51.297 54.237,51.968 54.412,52.143 C143.2@55.487,52.143 ; IC2.49@55.484,77.888 IC2.53@55.484,80.438 ; IC2.47@56.484,77.888 IC2.53@56.484,81.463 ; C35.1@57.425,72.6 58.041,72.6 C34.1@58.698,71.943 v1(59.684,71.943) ; IC2.22@57.484,85.788 57.484,86.79 v1(57.499,86.805) ; v1(57.634,67.814) 57.653,67.796 T4.2@58.355,67.796 ; C25.1@57.734,75.883 57.634,75.983 57.634,77.114 57.484,77.264 IC2.45@57.484,77.888 57.484,81.088 IC2.53@56.734,81.838 ; C136.2@57.923,51.222 57.973,51.273 v1(59.733,51.273) 59.738,51.277 59.738,51.948 59.914,52.124 C135.2@60.989,52.124 ; IC2.33@60.184,82.088 56.984,82.088 IC2.53@56.734,81.838 ; T8.2@60.562,16.154 61.623,16.154 v1(61.625,16.152) ; v1(61.797,41.925) C151.1@62.5,41.925 ; D1.1@75.084,60.084 v1(76.177,60.084) ; D2.1@75.084,65.034 v1(76.177,65.034) ; D3.1@75.084,71.069 76.151,71.069 v1(76.177,71.044) ; D4.1@75.084,74.975 75.089,74.98 75.254,74.98 v1(76.158,75.883) ; D5.1@75.084,78.884 75.088,78.881 76.173,78.881 v1(76.177,78.877) ; D6.1@75.084,84.434 75.106,84.413 76.155,84.413 v1(76.177,84.391) ; D7.1@75.084,92.235 75.109,92.26 76.109,92.26 v1(76.134,92.285) ; D8.1@75.084,88.085 v1(76.134,88.084) ; IC33.33@79.746,82.143 81.096,80.793 81.944,79.946 81.946,79.943 IC33.33@82.096,79.793 ; IC33.33@79.946,82.293 IC33.33@80.096,82.443 ; IC33.33@80.096,80.293 IC33.33@80.596,80.793 ; C84.1@80.596,86.108 C84.1@80.612,86.124 ; R119.1@81.558,86.124 R119.1@81.573,86.139 ; v1@85.828,78 C90.1@85.828,79.043 C88.1@85.828,79.994 ; C189.2@95.82,43.775 96.322,43.273 96.508,43.273 96.831,42.951 96.831,42.78 v1(96.869,42.741) 96.831,42.703 96.831,42.584 96.544,42.297 D16.2@96.16,42.297 ; D13.2@97.742,41.112 98.066,41.112 98.302,41.348 98.302,41.525 v1(98.522,41.745) 98.524,41.745 C73.2@99.187,42.408 ; IC21.11@98.5,79.2 IC21.8@98.5,81.4 ; IC23.1@101,95.744 101.275,95.744 101.867,95.152 v1(101.916,95.152) ; C129.1@108.325,27.766 108.55,27.766 108.6,27.716 C129.1@108.625,27.716 ; C188.2@108.7,38.075 108.7,38.85 108.675,38.875 108.675,39.125 108.95,39.4 v1@108.975,39.4 ; v1(115.313,80.78) 117.555,80.78 C167.1@117.574,80.799 ; v1(129.28,28.621) 129.299,28.64 129.945,28.64 R192.1@129.964,28.658 ; v1(129.61,31.017) 129.617,31.024 130.208,31.024 R211.1@130.215,31.031
  Bot w1.27: C127.1@53.704,4.604 55.175,4.604 pad.0@57.727,7.156 ; C122.1@54.253,7.156 pad.0@57.727,7.156 ; pad.0@58.4,7.6 57.956,7.156 pad.0@57.727,7.156
  other v1: 126.882,4.901 127.603,4.901 126.877,5.645 127.603,5.645 110.57,8.22 109.875,8.27 111.318,8.27 116.475,10.695 117.237,10.695 117.987,10.695 126.122,10.87 126.877,10.87 127.603,10.87 127.53,18.401 118.496,19.983 117.218,20.039 124.71,20.899 130.685,21.003 127.655,22.393 128.655,22.393 120.444,22.59 113.668,22.918 130.475,23.178 131.095,23.234 127.655,23.393 128.655,23.393 117.362,24.078 118.362,24.078 120.134,24.58 120.869,24.58 105.45,24.958 116.055,24.991 117.362,25.078 118.362,25.078 116.055,25.611 104.283,26.125 106.617,26.125 105.45,27.292 17.934,27.943 18.909,27.968 55.801,28.155 58.001,28.155 18.009,29.168 18.909,29.168 55.801,29.255 56.901,29.255 58.001,29.255 56.901,30.355 58.001,30.355 55.801,31.455 58.001,31.455 52.9,33.695 37.088,36.671 36.434,38.531 40.475,38.95 42.025,40.375 55.507,43.132 56.855,43.132 58.198,43.132 59.485,43.132 36.585,43.591 56.175,43.8 57.5,43.8 58.825,43.8 37.256,44.263 55.507,44.4 56.855,44.4 58.198,44.4 56.175,45.125 57.5,45.125 58.825,45.125 55.507,45.775 56.855,45.775 58.198,45.775 56.175,46.45 57.5,46.45 58.825,46.45 55.507,47.1 56.855,47.1 58.198,47.1 59.485,47.1 131.1,50.772 131.1,51.472 131.1,52.462 131.1,54.097 131.1,55.397 106.125,55.955 107.225,55.955 108.325,55.955 109.425,55.955 105.025,57.055 106.125,57.055 107.225,57.055 108.325,57.055 109.425,57.055 131,57.972 105.025,58.155 106.125,58.155 107.225,58.155 108.325,58.155 109.425,58.155 53.323,58.565 54.639,58.565 58.936,58.747 60.001,58.747 53.937,58.843 59.485,59.102 53.323,59.185 54.639,59.185 47.557,59.325 48.622,59.325 58.936,59.428 60.001,59.428 57.693,59.595 48.112,59.75 48.622,60.167 131.15,60.272 94.625,60.759 95.764,60.759 131.15,61.9 32.235,62.131 46.399,62.522 57.693,62.734 31.17,62.973 32.235,62.973 52.166,63.299 57.76,63.398 46.484,63.679 52.226,63.888 54.65,67.325 152.549,67.515 151.25,68.75 152.467,70.005 151.217,71.249 152.467,72.438 93.536,75.424 94.581,75.424 27.906,77.295 85.826,77.997 18.105,78.096 21.66,78.101 98.02,78.793 99.065,78.793 136.587,79.073 138.327,79.073 31.641,79.47 33.197,79.47 97.995,79.625 99.04,79.625 55.035,79.672 58.362,79.672 56.734,79.739 79.746,79.948 80.846,79.948 81.946,79.948 136.587,79.979 138.327,79.979 43.438,80.225 79.746,81.048 80.846,81.048 81.946,81.048 56.734,81.821 55.035,81.887 58.362,81.887 79.746,82.148 80.846,82.148 81.946,82.148 103.08,82.168 105.17,82.168 107.26,82.168 109.35,82.168 55.035,84.103 56.734,84.103 58.362,84.103 103.08,86.729 105.17,86.729 107.26,86.729 109.35,86.729 61.504,86.917 51.492,87.44 94.325,88.8 97.125,88.905 98.475,89.01 99.52,89.01 46.3,89.594 34.627,89.762 46.299,90.71
  other v2: 148.75,62.25 148.75,63.175 148.75,64.099
  other v5: 147.21,79.433
GNDF: FL1.3 J9.1 J10.1 J10.2
HRTIM_CHA1: J4.14 JB1.32 | length 42.6
  Top w0.125: JB1.32@100.975,34.704 v1(100.975,35.779)
  Bot w0.125: J4.14@65.73,23.92 66.733,22.917 69.069,22.917 70.072,23.92 88.578,23.92 94.12,29.463 94.12,30.303 99.596,35.779 v1(100.975,35.779)
HRTIM_CHA2: J4.15 JB1.46 | length 50.6
  Top w0.16: v1(104.475,33.629) JB1.46@104.475,34.704
  L3 w0.125: v1(89.164,29.102) 89.164,30.797 93.83,35.462 93.83,36.022 94.165,36.357 94.724,36.357 95.611,37.244 97.412,37.244 99.268,39.1 99.393,39.1 99.704,39.41 101.134,39.41 102.124,40.4 103.125,40.4 103.423,40.102 103.423,38.298 103.805,37.916 103.805,37.255 103.475,36.925 103.475,34.629 v1(104.475,33.629)
  Bot w0.125: J4.15@68.27,26.46 86.522,26.46 v1(89.164,29.102)
HRTIM_CHE1: J4.11 JB1.38 | length 41.8
  Top w0.16: v1(102.475,33.629) JB1.38@102.475,34.704
  Bot w0.125: J4.11@68.27,21.38 69.463,21.38 69.963,21.88 90.315,21.88 97.295,28.86 97.295,31.371 98.948,33.025 101.871,33.025 v1(102.475,33.629)
HRTIM_CHE2: J4.12 JB1.34 | length 43.1
  Top w0.125: v1(101.475,33.62) JB1.34@101.475,34.704
  Bot w0.125: J4.12@65.73,21.38 66.842,22.492 70.057,22.492 70.219,22.654 89.295,22.654 96.72,30.078 96.72,31.458 99.328,34.066 101.007,34.066 101.453,33.62 v1(101.475,33.62)
I2C1_SCL: J4.27 JB1.69 | length 51.2
  Top w0.125: v1(94.013,48) 94.115,48 94.373,47.742 99.951,47.742 101.825,45.868 101.825,44.052 103.297,42.58 108.369,42.58 110.475,40.474 JB1.69@110.475,38.404
  Bot w0.125: J4.27@68.27,41.7 73.113,41.7 78.888,47.475 83.495,47.475 83.603,47.367 89.899,47.367 90.532,48 v1(94.013,48)
I2C1_SDA: J4.26 JB1.65 | length 53.1
  Top w0.125: v1(95.04,47.305) 100.035,47.305 101.386,45.954 101.386,44.062 103.261,42.188 107.726,42.188 109.475,40.439 JB1.65@109.475,38.404
  L3 w0.152: J4.26@65.73,39.16 66.791,39.16 67.906,40.275 68.934,40.275 69.896,41.237 70.35,41.237 v1(70.375,41.263)
  Bot w0.125: v1(70.375,41.263) 70.406,41.294 73.061,41.294 77.543,45.777 78.451,45.777 79.709,47.035 89.834,47.035 89.916,47.117 90.44,47.117 90.628,47.305 v1(95.04,47.305)
I2C_SCL: D21.4 IC7.1 J2.27 R229.1 T14.3 TP16.1 | length 110.7
  Top w0.152: R229.1@96.445,13.049 96.659,13.263 96.659,14.465 96.825,14.631 v1(96.825,14.725) 96.825,15.326 97.498,16 101.081,16 101.566,15.515 101.916,15.515 TP16.1@102.475,14.956 ; D21.4@145.765,26.441 145.765,26.451 145.839,26.525 v1(146.375,26.525) ; IC7.1@149.125,26.125 149.8,26.125 v1(149.95,25.975)
  L3 w0.152: v1(150.882,21.003) 152.112,22.233 152.205,22.233 152.75,22.778 J2.27@153.114,22.778
  Bot w0.152: v1(96.825,14.725) 96.825,7.005 97.5,6.33 104.013,6.33 104.683,7 113.534,7 113.812,7.277 115.027,7.277 115.25,7.5 125.397,7.5 125.607,7.71 135.754,7.71 137.998,5.466 141.823,5.466 142.936,6.578 145.984,6.578 147.847,8.441 147.847,9.136 150.882,12.171 v1(150.882,21.003) ; T14.3@134.685,31.031 135.774,31.031 140.292,26.513 149.38,26.513 J2.27@153.114,22.778
I2C_SDA: D21.6 IC7.3 J2.26 R227.1 T13.3 TP15.1 | length 106.2
  Top w0.152: R227.1@96.483,11.983 96.483,12.003 96.98,12.5 97.125,12.5 97.325,12.7 v1(97.325,13.75) 97.325,13.806 TP15.1@98.475,14.956 ; v1(144.2,25.925) 144.384,25.925 144.765,26.306 D21.6@144.765,26.441 ; v1(147.225,25.127) IC7.3@147.225,26.125
  Bot w0.152: v1(97.325,13.75) 97.295,13.72 97.295,6.972 97.384,6.883 103.742,6.883 104.189,7.33 110.318,7.33 110.765,7.777 123.212,7.777 123.422,7.988 135.869,7.988 137.568,6.289 140.832,6.289 141.399,6.856 145.869,6.856 147.569,8.556 147.569,9.251 150,11.681 150,21.425 149.95,21.475 ; T13.3@134.685,27.293 137.952,27.293 139.32,25.925 v1(144.2,25.925) 146.5,25.925 147.262,25.163 v1(147.225,25.127) 147.225,23.89 149.64,21.475 149.95,21.475 ; J2.26@155.654,25.318 154.379,24.043 154.379,21.674 154.18,21.475 152.892,21.475 152.648,21.231 151.361,21.231 151.117,21.475 149.95,21.475
IOUT_N: C62.2 IC31.29 R9.2 R10.1 R71.1 | length 18.3
  Top w0.16: R71.1@41.234,31.186 42.592,31.186 C62.2@42.617,31.161 42.642,31.161 43.037,31.556 43.037,31.581 43.257,31.801 44.737,31.801 47.836,28.702 48.009,28.529 cw(c47.975,28.495) 48.009,28.461 47.512,27.963 ccw(c47.545,27.929) 47.512,27.895 47.67,27.737 ccw(c47.704,27.771) 47.738,27.737 48.236,28.235 cw(c48.27,28.201) 48.303,28.235 48.496,28.042 48.722,27.816 48.835,27.703 48.911,27.627 49.755,27.627 49.909,27.474 v1(50.001,27.474) 50.093,27.474 50.246,27.627 50.825,27.627 50.826,27.628 51.058,27.628 51.356,27.33 R10.1@51.376,27.33 51.396,27.33 R10.1@51.61,27.544 ; R10.1@51.61,27.545 51.699,27.634 51.898,27.634 51.901,27.63 52.154,27.63 52.676,28.153 52.952,28.153 53.05,28.055 IC31.29@53.351,28.055
  Bot w0.152: v1@50.211,27.474 50.306,27.474 50.467,27.635 50.942,27.635 50.944,27.633 51.305,27.633 51.394,27.544 51.394,27.391 R9.2@51.768,27.017
IOUT_P: C62.1 IC31.28 R7.1 R8.2 R75.1 | length 18.9
  Top w0.16: R75.1@39.696,31.204 39.746,31.204 40.671,32.129 41.959,32.129 42.592,32.761 42.642,32.761 43.037,32.366 43.037,32.341 43.257,32.121 44.869,32.121 49.044,27.947 49.755,27.947 49.909,28.101 v1(50.001,28.101) 50.093,28.101 50.246,27.947 50.693,27.947 ; IC31.28@53.351,28.555 53.05,28.555 52.952,28.457 52.55,28.457 52.028,27.934 52.024,27.938 51.704,27.938 51.615,28.027 51.615,28.03 51.401,28.244 R7.1@51.381,28.244 51.361,28.244 51.065,27.948 50.694,27.948 ; 50.693,27.947 50.694,27.948
  Bot w0.152: v1@50.211,28.101 50.306,28.101 50.467,27.939 51.068,27.939 51.07,27.937 51.305,27.937 51.394,28.026 51.394,28.179 R8.2@51.768,28.553
JADC1_IN2_N: J3.4 R26.2 | length 8.2
  Top w0.125: J3.4@65.759,63.299 67.043,64.583 69.961,64.583 70.701,65.323 R26.2@73.132,65.323
JADC1_IN2_P: J3.1 R24.2 | length 4.9
  Top w0.125: J3.1@68.27,60.76 72.03,60.76 72.11,60.68 R24.2@73.132,60.68
JADC2_IN2_N: J3.16 R34.2 | length 10.7
  Top w0.125: J3.16@65.759,78.539 67.029,79.809 69.309,79.809 71.068,81.568 71.068,83.395 71.568,83.895 R34.2@73.132,83.895
JADC2_IN2_P: J3.13 R32.2 | length 7.2
  Top w0.125: J3.13@68.299,75.999 69.849,75.999 71.068,77.218 71.068,78.877 71.479,79.288 73.096,79.288 R32.2@73.132,79.252
JADC3_IN5_N: J3.10 R30.2 | length 9.6
  Top w0.125: J3.10@65.759,70.919 65.759,70.934 67.034,72.209 70.268,72.209 71.068,73.009 71.068,74.196 71.481,74.609 R30.2@73.132,74.609
JADC3_IN5_P: J3.7 R28.2 | length 5.5
  Top w0.125: J3.7@68.299,68.379 69.886,69.966 R28.2@73.132,69.966
JTAG.JTAG_REF: J17.2 JB2.92 | length 69.5
  Top w0.254: J17.2@91.395,89.95 91.395,88.301 92.081,87.615 99.289,87.615 100.868,89.193 120.457,89.193 124.05,85.6 124.05,64.099 122.95,62.999 117.663,62.999 115.975,64.687 JB2.92@115.975,66.704
JTAG.TCK_B: J17.6 JB2.100 | length 59
  Top w0.125: JB2.100@117.975,66.704 v1(117.975,67.779)
  Top w0.16: J17.6@87.422,90.28 87.422,88.274 89.081,86.615 100.34,86.615 101.75,88.025 111.329,88.025 113.514,85.84 118.912,85.84 122.25,82.502 v1(122.25,72.238)
  L3 w0.152: v1(117.975,67.779) 117.975,69.675 120.538,72.238 v1(122.25,72.238)
JTAG.TDI_B: J17.10 JB2.96 | length 58.6
  Top w0.125: JB2.96@116.975,66.704 116.975,67.779
  Top w0.16: J17.10@83.422,90.28 83.422,88.274 86.052,85.644 101.165,85.644 102.389,84.42 114.994,84.42 120.7,78.714 120.7,69.45 119.6,68.35 118.134,68.35 117.825,68.66 117.186,68.66 116.975,68.449 116.975,67.779
JTAG.TDO_B: J17.8 JB2.98 | length 62.2
  Top w0.125: v1(117.475,65.629) JB2.98@117.475,66.704
  Top w0.16: J17.8@85.422,90.28 85.422,88.274 87.602,86.094 101.806,86.094 102.775,85.125 115.564,85.125 121.407,79.282 121.407,70.986 122.25,70.143 122.25,65.78 121.218,64.747 118.356,64.747 v1(117.475,65.629)
JTAG.TMS_B: J17.4 JB2.94 | length 67.3
  Top w0.16: J17.4@89.422,90.28 89.454,90.247 89.454,88.486 90.875,87.065 99.794,87.065 101.379,88.65 119.569,88.65 122.993,85.226 122.993,64.902 121.941,63.85 117.898,63.85 116.475,65.273 JB2.94@116.475,66.704
LED1: JB1.70 R159.2 | length 20.8
  Top w0.125: R159.2@100.535,24.496 110.287,24.496 111.318,25.527 111.318,32.11 110.349,33.08 110.349,33.348 110.475,33.474 JB1.70@110.475,34.704
LED2: JB1.68 R161.2 | length 18.7
  Top w0.125: R161.2@100.535,25.715 102.065,25.715 102.975,26.625 109.15,26.625 110.009,27.484 110.669,27.484 111.031,27.846 111.031,31.871 109.975,32.927 JB1.68@109.975,34.704
LED3: JB1.66 R162.2 | length 15.5
  Top w0.125: R162.2@100.535,26.935 101.352,26.935 104.176,26.935 105.537,28.297 106.829,28.297 107.153,28.621 107.153,30.266 106.604,30.816 106.604,31.579 107.486,32.461 108.726,32.461 109.475,33.21 JB1.66@109.475,34.704
LPTIM2_OUT: J4.17 JB1.44 | length 50.1
  Top w0.16: JB1.44@103.975,34.704 v1(103.975,35.779)
  L3 w0.125: v1(88.993,31.939) 88.993,31.965 92.539,35.511 92.539,35.985 92.911,36.357 93.385,36.357 94.537,37.509 94.794,37.766 95.949,38.92 95.949,41.168 97.045,42.265 98.621,42.265 99.948,40.937 104.138,40.937 104.442,40.633 104.442,38.954 104.055,38.566 104.055,37.152 103.975,37.071 v1(103.975,35.779)
  Bot w0.125: J4.17@68.27,29 68.294,29.024 85.871,29.024 88.785,31.939 v1(88.993,31.939)
LVDS0_N: J2.3 JB2.53 | length 61
  Top w0.16: JB2.53@106.475,70.404 106.475,71.042 106.385,71.132 106.385,71.526 106.382,71.529 106.382,71.763 106.555,71.936 v1(106.555,72.004)
  Bot w0.16: v1@106.475,71.918 106.475,72.16 106.402,72.232 106.402,72.498 107.434,73.53 128.517,73.53 137.167,64.88 139.467,64.88 149.96,54.388 150.092,54.388 150.252,54.388 150.524,54.388 cw(c150.524,54.34) 150.572,54.34 150.572,54.036 ccw(c150.62,54.036) 150.62,53.988 150.844,53.988 ccw(c150.844,54.036) 150.892,54.036 150.892,54.34 cw(c150.94,54.34) 150.94,54.388 151.164,54.388 cw(c151.164,54.34) 151.212,54.34 151.212,54.036 ccw(c151.26,54.036) 151.26,53.988 151.484,53.988 ccw(c151.484,54.036) 151.532,54.036 151.532,54.34 cw(c151.58,54.34) 151.58,54.388 151.718,54.388 153.843,54.388 153.843,54.001 153.114,53.272 J2.3@153.114,53.258
LVDS0_P: J2.2 JB2.51 | length 60.8
  Top w0.16: v1(105.855,72.004) 105.855,71.98 105.85,71.975 106.062,71.763 106.062,71.396 106.065,71.394 106.065,71.132 105.975,71.042 JB2.51@105.975,70.404
  Bot w0.16: v1@105.959,72.079 106.082,72.201 106.082,72.63 107.344,73.892 128.608,73.892 137.3,65.2 139.6,65.2 150.092,54.708 154.564,54.708 J2.2@155.654,55.798
LVDS1_N: J2.6 JB2.93 | length 51.9
  Top w0.16: JB2.93@116.475,70.404 116.475,71.042 116.385,71.132 116.385,71.394 116.499,71.508 116.499,71.958 116.651,72.11 v1(116.651,72.157)
  Bot w0.16: v1(116.651,72.157) 116.651,72.249 116.938,72.536 116.938,72.567 117.051,72.68 118.451,72.68 128.036,63.096 138.844,63.096 145.471,56.468 145.471,56.212 152.325,49.358 153.811,49.358 154.544,50.092 154.544,50.625 154.638,50.718 J2.6@155.654,50.718
LVDS1_P: J2.5 JB2.91 | length 52.1
  Top w0.16: JB2.91@115.975,70.404 115.975,71.042 116.065,71.132 116.065,71.526 116.101,71.563 116.101,71.685 116.21,71.794 116.045,71.959 v1(116.042,71.959)
  Bot w0.16: v1(116.042,71.959) 116.107,72.024 116.107,72.259 116.848,73 118.584,73 128.168,63.416 138.976,63.416 145.791,56.601 145.791,56.345 152.457,49.678 153.678,49.678 154.224,50.224 154.224,50.625 154.131,50.718 J2.5@153.114,50.718
LVDS2_N: J2.9 JB2.88 | length 56.3
  Top w0.16: JB2.88@114.975,66.704 114.975,67.344 114.881,67.438 114.881,67.731 114.881,68.038 114.876,68.043 114.876,68.237 115.05,68.411 v1(115.05,68.5)
  Bot w0.16: v1(115.05,68.5) 115.012,68.5 114.992,68.48 114.992,68.235 114.877,68.12 114.877,67.323 121.2,61 130.779,61 130.828,61.049 134.858,61.049 137.777,58.13 139.659,58.13 140.146,58.618 141.234,58.618 147.497,52.355 147.497,51.144 152.074,46.568 152.074,45.154 152.778,44.45 153.775,44.45 154.225,44.9 154.225,45.855 153.331,45.855 J2.9@153.114,45.638